# Altium PCB STPMotorControl_1.PcbDoc
Units mm, origin at the board's own origin, x right, y up, seen from the top; angles counter-clockwise.
Board outline 150.88 x 99.69 mm, 6 copper layers (Top Layer, Int1 (GND), Int2 (Sign), Int3 (Sign), Int4 (PWR), Bottom Layer), stack 1.551 mm thick; 149 components, 139 nets, 715 pads, 2 vias.
Unrouted connection lines stored in the file: 411.
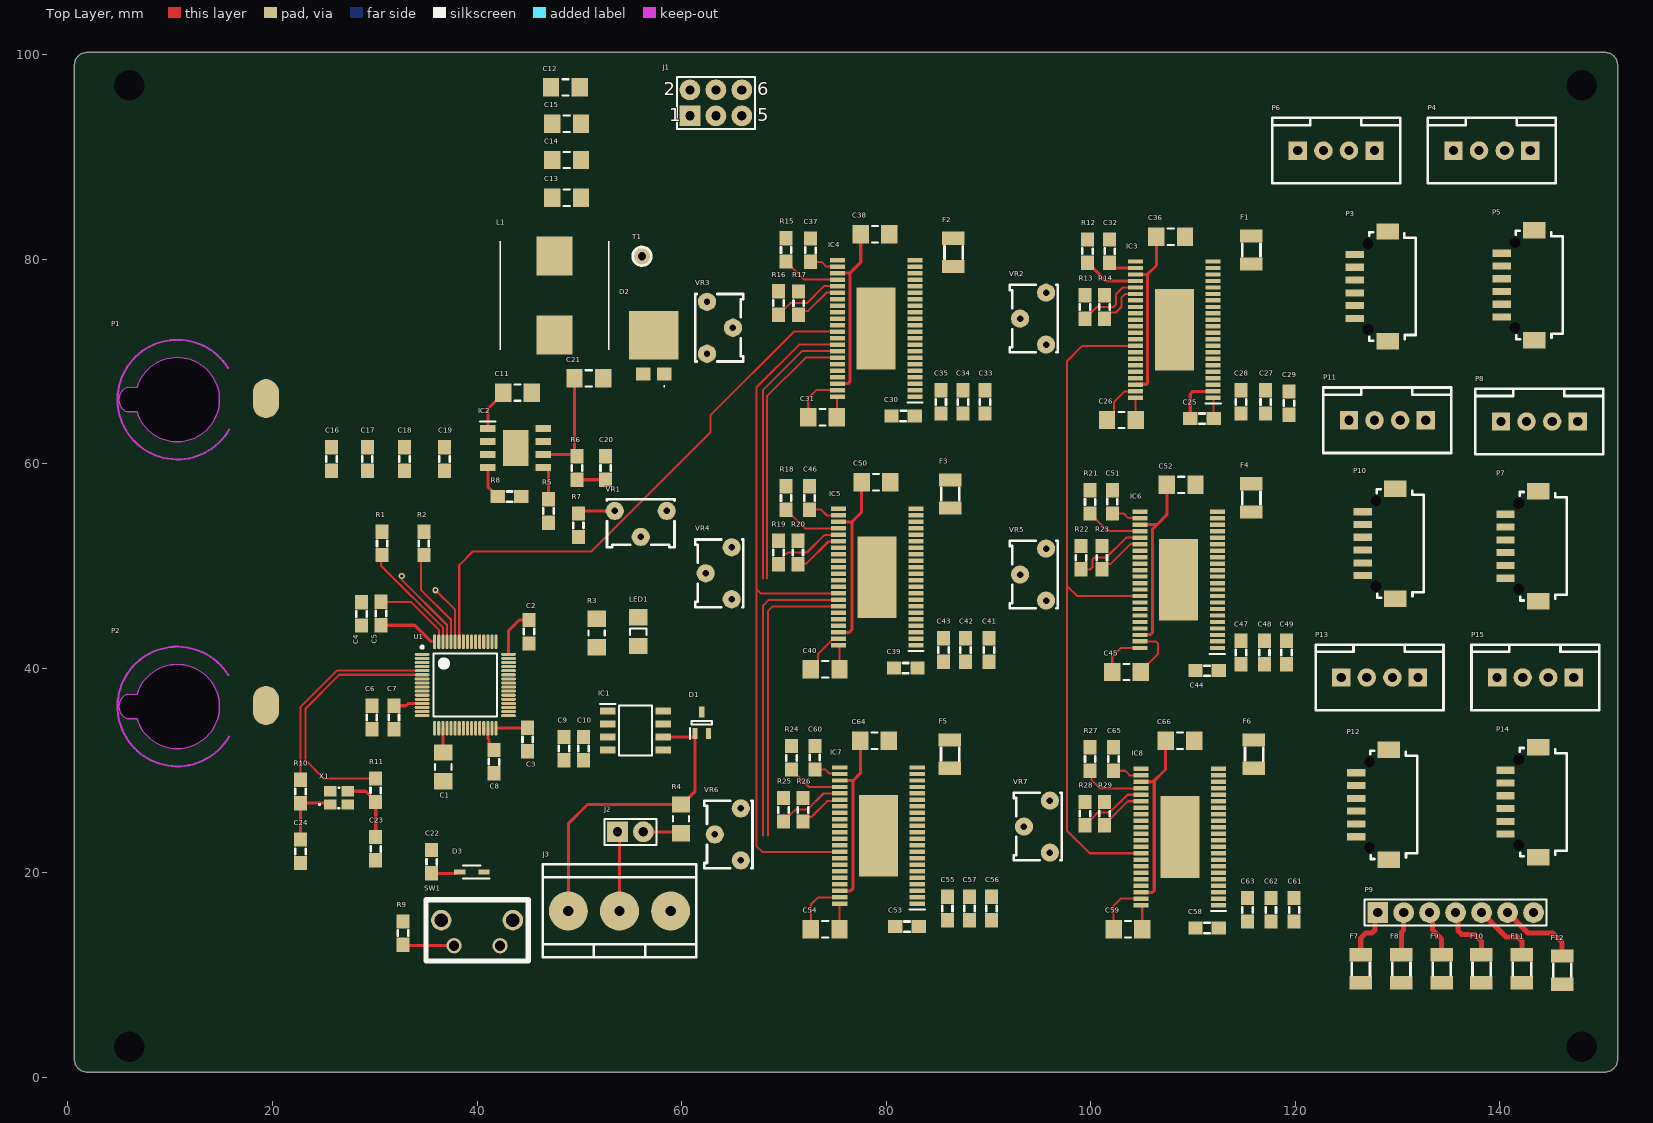
[diagram p0: Top Layer view]
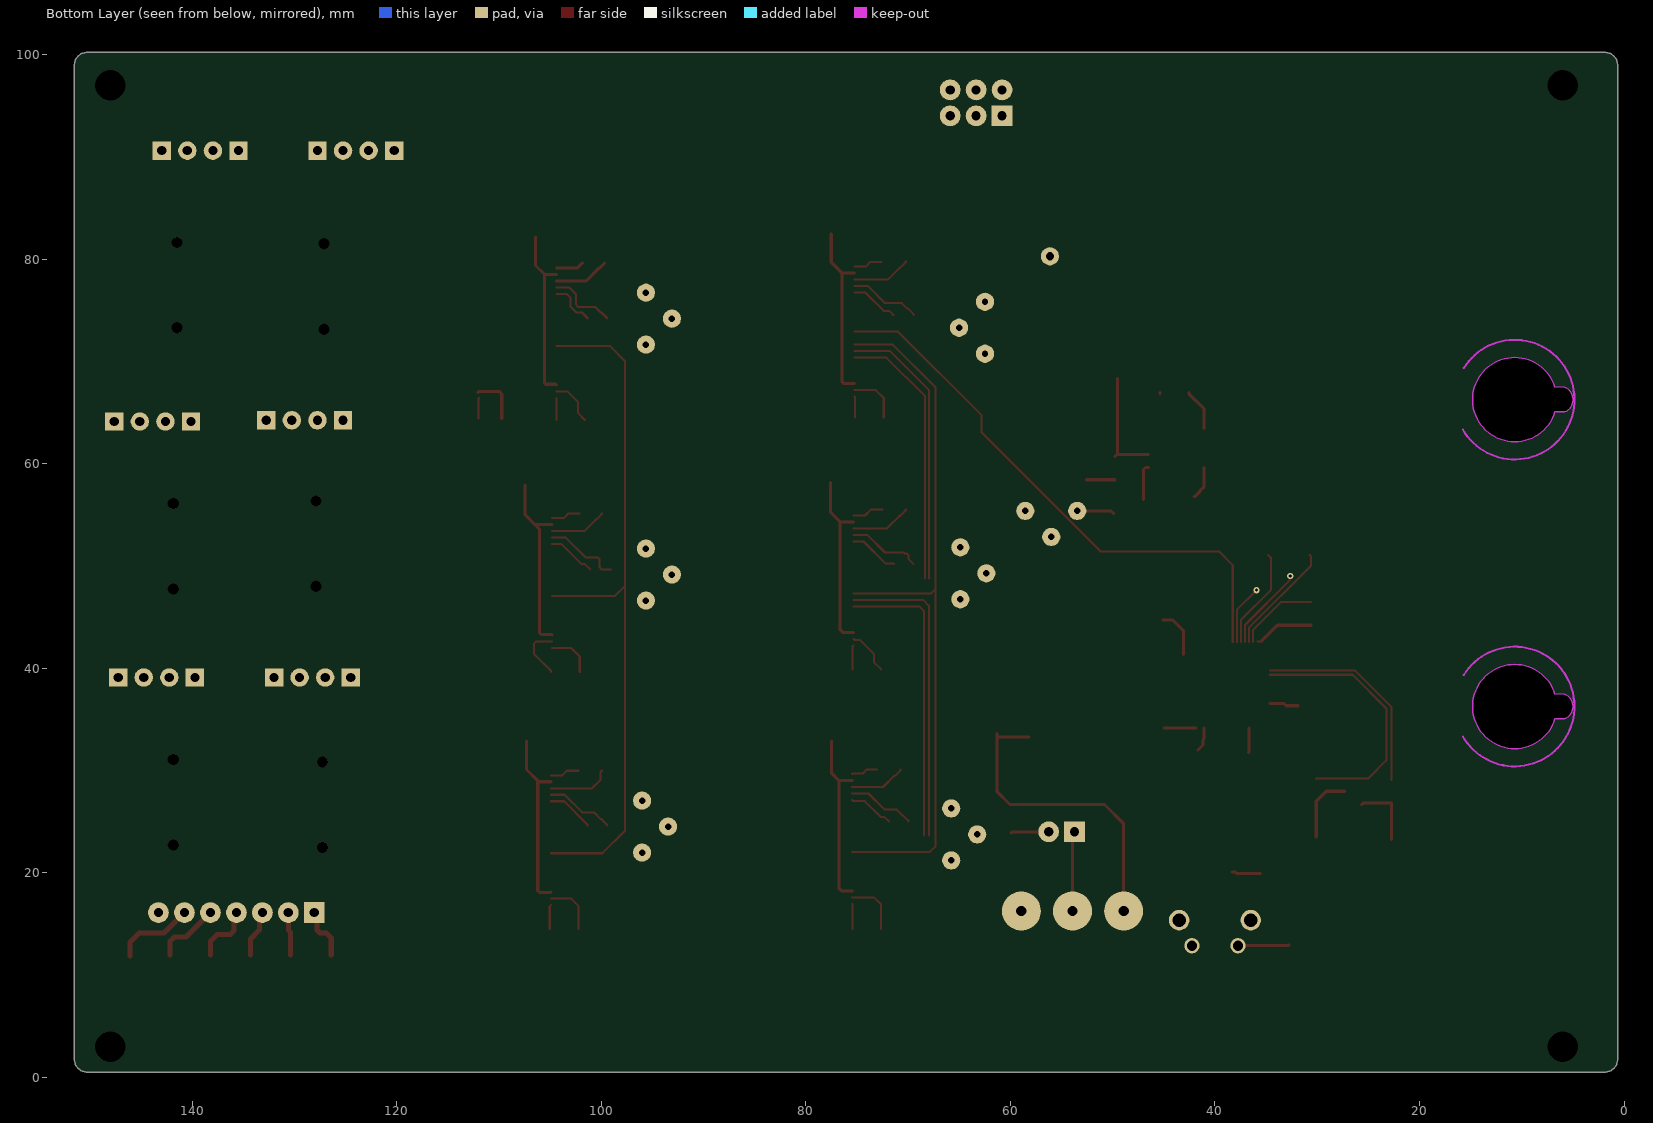
[diagram p1: Bottom Layer view, seen from below]
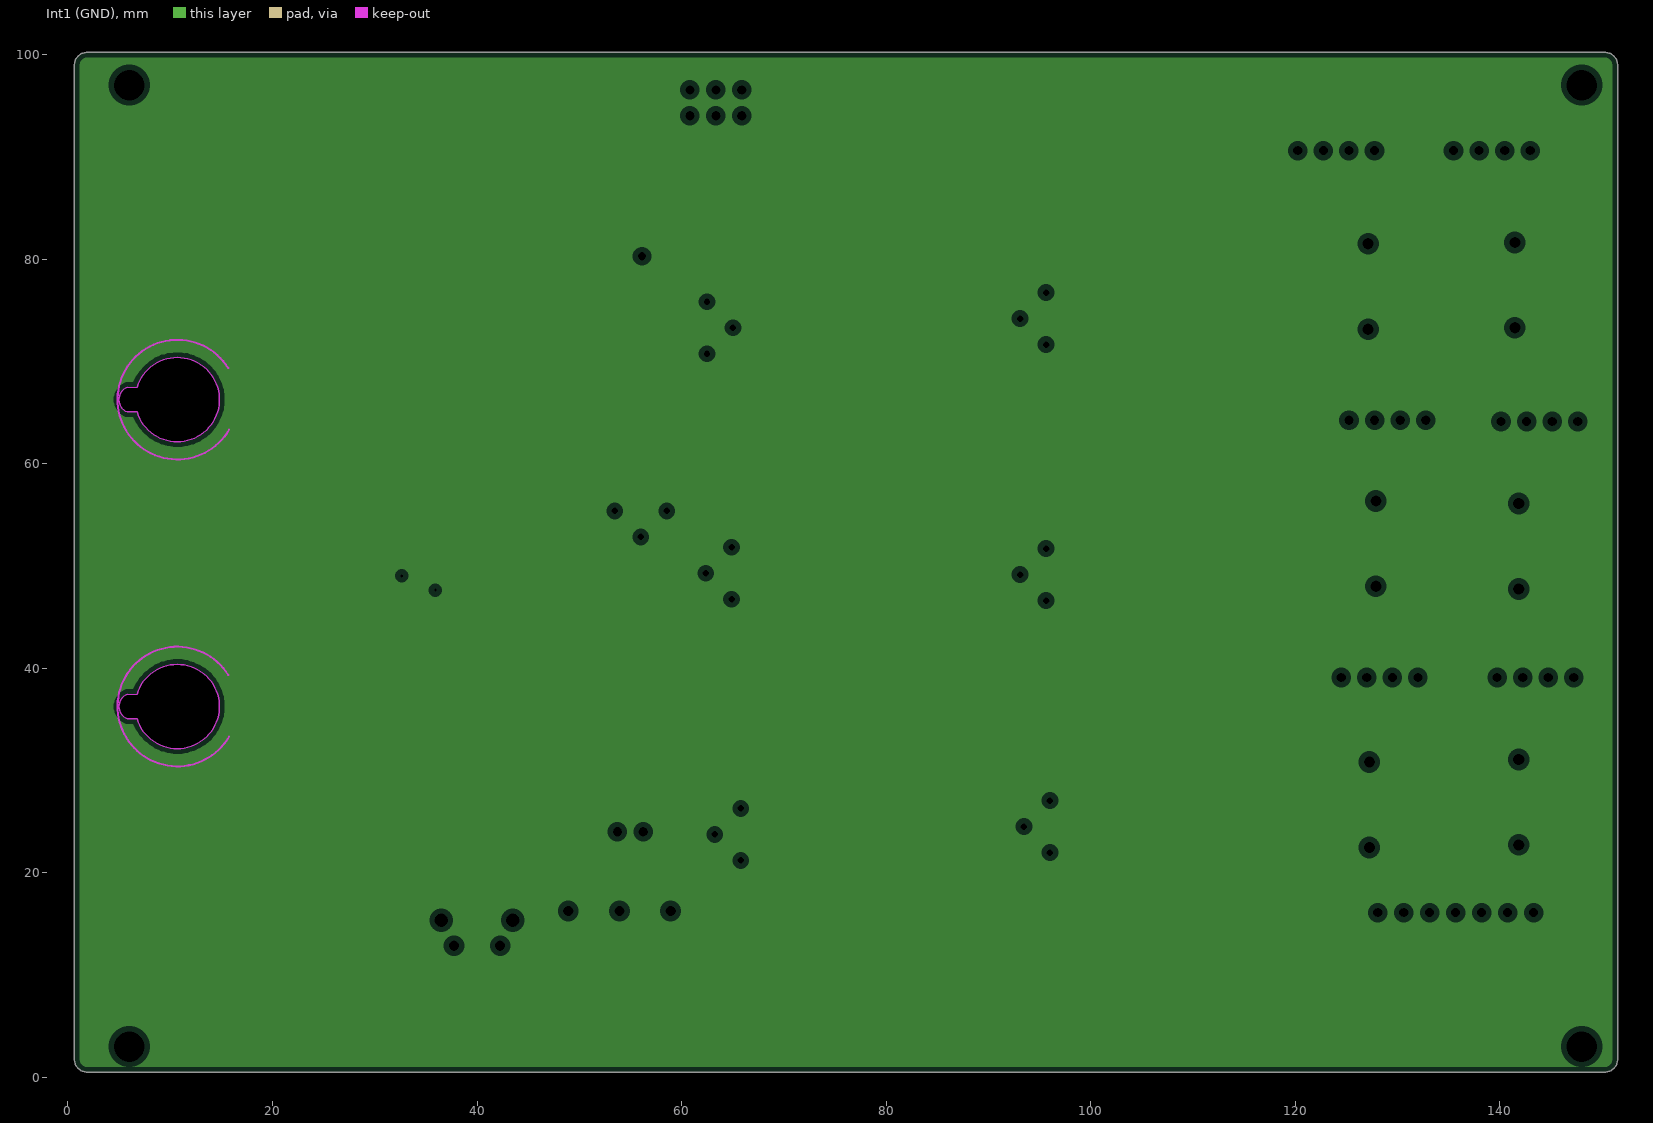
[diagram p2: Int1 (GND), clearances drawn from the general rule]
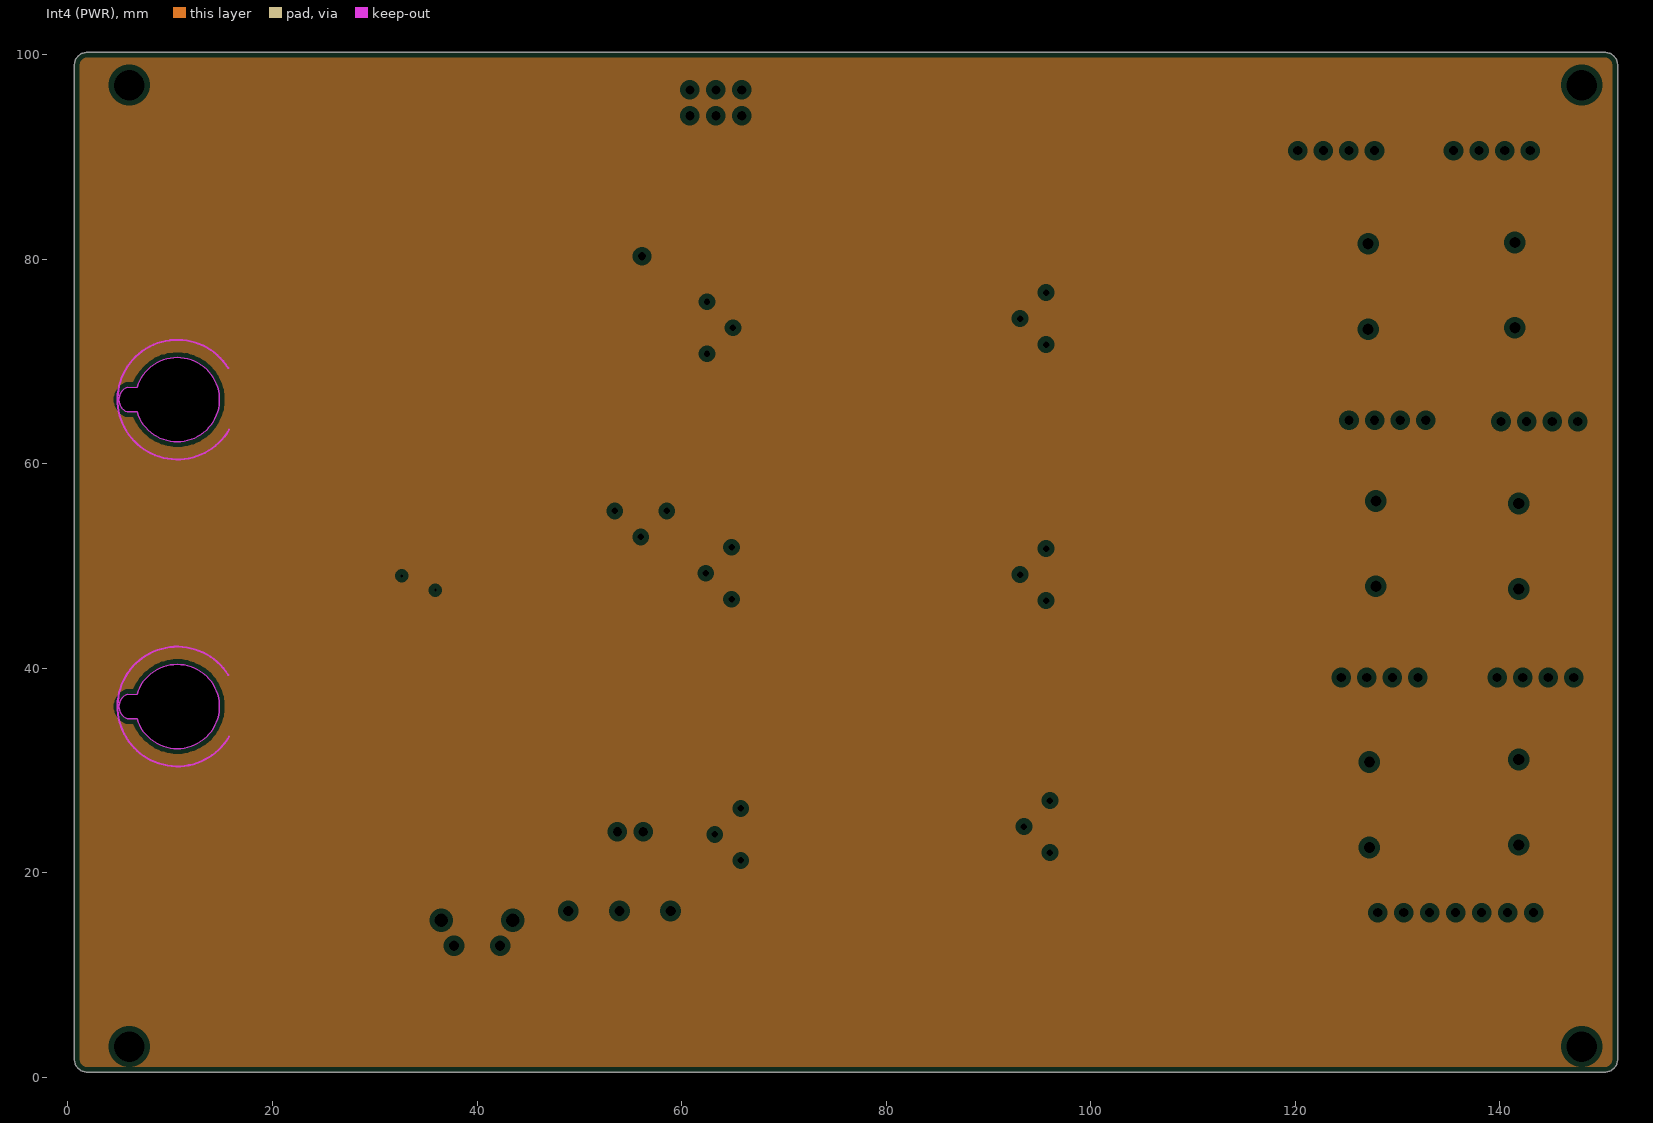
[diagram p3: Int4 (PWR), clearances drawn from the general rule]

## Layer stack, top to bottom
Top Solder: solder mask 0.0254, SM-001, Dk 4
Top Layer: signal copper 0.035
Dielectric 1: prepreg 0.0711, PP-006, Dk 4.1
Dielectric 2: prepreg 0.0711, PP-006, Dk 4.1
Int1 (GND): plane copper 0.035
Dielectric 3: core 0.4572, Core-035, Dk 4.7
Int2 (Sign): signal copper 0.035
Dielectric 4: prepreg 0.0711, PP-006, Dk 4.1
Dielectric 5: prepreg 0.0711, PP-006, Dk 4.1
Int3 (Sign): signal copper 0.035
Dielectric 6: core 0.4572, Core-035, Dk 4.7
Int4 (PWR): plane copper 0.035
Dielectric 7: prepreg 0.0711, PP-006, Dk 4.1
Dielectric 8: prepreg 0.0711, PP-006, Dk 4.1
Bottom Layer: signal copper 0.035
Bottom Solder: solder mask 0.0254, SM-001, Dk 4

## Board outline
0.635,1.778 0.635,98.933 cw(c1.905,98.933) 1.905,100.203 150.241,100.203 cw(c150.241,98.933) 151.511,98.933 151.511,1.778 cw(c150.241,1.778) 150.241,0.508 1.905,0.508 cw(c1.905,1.778)

## Design rules (kind name [scope] priority, off if disabled: settings)
Clearance [All] p1: gap=0.2 ignorepadtopadclearanceinfootprint=TRUE except(0.05: Arc-SMDPad Track-SMDPad)
PlaneClearance [All] p1: clearance=0.508
PlaneConnect [All] p1: planeconnectstyle=Direct reliefexpansion=0.508 reliefentries=4 reliefconductorwidth=0.254 reliefairgap=0.254
PolygonConnect [All] p1: connectstyle=Relief reliefconductorwidth=0.254 reliefentries=4 polygonreliefangle="90 Angle" airgapwidth=0.254
RoutingVias [All] p1: holewidth=0.305 width=0.61 viastyle="Through Hole" minholewidth=0.305 minwidth=0.61 maxholewidth=0.305 maxwidth=0.61
SolderMaskExpansion [All] p1: expansion=0.102 istentingtop=FALSE
SupplyNets "Schematic Supply Nets_2" [InNet('+3V3')] p1: voltage=0.000
SupplyNets "Schematic Supply Nets_1" [InNet('GND')] p2: voltage=0.000
SupplyNets "Schematic Supply Nets" [InNet('+48V')] p3: voltage=0.000
UnRoutedNet [All] p1: checkbadconnections=TRUE
Width [All] p1: maxlimit=1 minlimit=0.2 preferedwidth=0.3 midlayer1_minwidth=0.254 midlayer1_maxwidth=0.254 midlayer1_prefwidth=0.254 midlayer2_minwidth=0.254 midlayer2_maxwidth=0.254 midlayer2_prefwidth=0.254 minimp=50.000000 maximp=50.000000 favimp=50.000000
27 further rules are at their usual default settings.

## Classes and differential pairs
component class Designator: C53 C54 C55 C56 C57 C58 C59 C60 C61 C62 C63 C64 C65 C66 F5 F6 IC7 IC8 R24 R25 R26 R27 R28 R29 VR6 VR7

## Components (designator, comment, footprint, x,y, rotation, side; value= is the part's Value field where it differs from the comment)
C1 "4.7uF" CAP_1206 36.703,28.95 r90 top
C2 "100nF" CAP_0805 45.085,42.418 r90 top
C3 "100nF" CAP_0805 44.958,31.877 r90 top
C4 "100nF" CAP_0805 28.695,46.448 r270 top
C5 "100nF" CAP_0805 30.607,46.482 r270 top
C6 "1uF" CAP_0805 29.718,34.036 r90 top
C7 "100nF" CAP_0805 31.877,34.036 r90 top
C8 "2.2uF" CAP_0805 41.656,32.004 r270 top
C9 "1uF" CAP_0805 48.514,30.988 r90 top
C10 "100nF" CAP_0805 50.419,30.988 r90 top
C11 "0.1uF" CAP_1206 42.558,66.94 r0 top
C12 "10uF" CAP_1206 50.038,96.774 r180 top
C13 "47uF" CAP_1206 50.165,85.979 r180 top
C14 "47uF" CAP_1206 50.165,89.679 r180 top
C15 "47uF" CAP_1206 50.165,93.237 r180 top
C16 "2.2uF" CAP_0805 25.781,59.309 r90 top
C17 "2.2uF" CAP_0805 29.276,59.309 r90 top
C18 "2.2uF" CAP_0805 32.907,59.309 r90 top
C19 "2.2uF" CAP_0805 36.828,59.309 r90 top
C20 "10nF" CAP_0805 52.578,58.42 r90 top
C21 "220pF" CAP_1206 49.53,68.326 r0 top
C22 "100nF" CAP_0805 35.56,22.225 r270 top
C23 "7pF" CAP_0805 30.099,23.495 r270 top
C24 "7pF" CAP_0805 22.733,23.241 r270 top
C25 "1uF" CAP_0805 109.728,64.389 r0 top
C26 "0.1uF" CAP_1206 104.394,64.262 r180 top
C27 "1uF" CAP_0805 117.094,67.183 r270 top
C28 "10nF" CAP_0805 114.681,67.183 r270 top
C29 "10nF" CAP_0805 119.38,67.056 r270 top
C30 "1uF" CAP_0805 80.518,64.643 r0 top
C31 "0.1uF" CAP_1206 75.184,64.516 r180 top
C32 "1uF" CAP_0805 101.854,81.915 r270 top
C33 "1uF" CAP_0805 89.662,67.183 r270 top
C34 "10nF" CAP_0805 87.503,67.183 r270 top
C35 "10nF" CAP_0805 85.344,67.183 r270 top
C36 "0.1uF" CAP_1206 109.22,82.169 r180 top
C37 "1uF" CAP_0805 72.597,82.007 r270 top
C38 "0.1uF" CAP_1206 80.318,82.423 r180 top
C39 "1uF" CAP_0805 83.058,40.005 r180 top
C40 "0.1uF" CAP_1206 72.644,39.878 r0 top
C41 "1uF" CAP_0805 90.043,42.926 r270 top
C42 "10nF" CAP_0805 87.757,42.926 r270 top
C43 "10nF" CAP_0805 85.598,42.926 r270 top
C44 "1uF" CAP_0805 112.522,39.751 r180 top
C45 "0.1uF" CAP_1206 104.902,39.624 r180 top
C46 "1uF" CAP_0805 72.517,55.499 r90 top
C47 "1uF" CAP_0805 114.681,42.672 r270 top
C48 "10nF" CAP_0805 116.967,42.672 r270 top
C49 "10nF" CAP_0805 119.126,42.672 r270 top
C50 "0.1uF" CAP_1206 77.597,58.166 r0 top
C51 "1uF" CAP_0805 102.108,55.118 r90 top
C52 "0.1uF" CAP_1206 107.442,57.912 r0 top
C53 "1uF" CAP_0805 83.185,14.732 r180 top
C54 "0.1uF" CAP_1206 72.644,14.478 r0 top
C55 "1uF" CAP_0805 85.979,17.653 r270 top
C56 "10nF" CAP_0805 90.297,17.653 r270 top
C57 "10nF" CAP_0805 88.138,17.653 r270 top
C58 "1uF" CAP_0805 112.522,14.605 r180 top
C59 "0.1uF" CAP_1206 102.235,14.478 r0 top
C60 "1uF" CAP_0805 73.025,30.099 r90 top
C61 "1uF" CAP_0805 119.888,17.526 r270 top
C62 "10nF" CAP_0805 117.602,17.526 r270 top
C63 "10nF" CAP_0805 115.316,17.526 r270 top
C64 "0.1uF" CAP_1206 77.47,32.893 r0 top
C65 "1uF" CAP_0805 102.235,29.972 r90 top
C66 "0.1uF" CAP_1206 107.315,32.893 r0 top
D1 "ESDCAN03-2BWY" SOT65P210X110-3N 61.976,34.671 r90 top
D2 "SS5P6-M3_87A" SS5P6M387A 57.277,71.501 r0 top
D3 "TSD05CDYFR" SOD2613X100N 39.497,20.066 r180 top
F1 "1206L035/16YR" MC36207 115.697,79.502 r90 top
F2 "1206L035/16YR" MC36207 86.58,79.274 r90 top
F3 "1206L035/16YR" MC36207 86.259,55.651 r90 top
F4 "1206L035/16YR" MC36207 115.697,55.27 r90 top
F5 "1206L035/16YR" MC36207 86.233,30.226 r90 top
F6 "1206L035/16YR" MC36207 115.951,30.226 r90 top
F7 "1206L035/16YR" MC36207 126.399,9.237 r90 top
F8 "1206L035/16YR" MC36207 130.363,9.237 r90 top
F9 "1206L035/16YR" MC36207 134.3,9.237 r90 top
F10 "1206L035/16YR" MC36207 138.198,9.237 r90 top
F11 "1206L035/16YR" MC36207 142.147,9.237 r90 top
F12 "1206L035/16YR" MC36207 146.084,9.11 r90 top
IC1 "TCAN3403DRQ1" SOIC127P600X175-8N 55.499,33.909 r0 top
IC2 "RT6365GSP" SOIC127P600X175-9N 43.776,61.522 r0 top
IC3 "DRV8462DDWR" SOP64P810X120-45N 108.182,73.088 r180 top
IC4 "DRV8462DDWR" SOP64P810X120-45N 79.016,73.216 r180 top
IC5 "DRV8462DDWR" SOP64P810X120-45N 79.121,48.895 r180 top
IC6 "DRV8462DDWR" SOP64P810X120-45N 108.585,48.641 r180 top
IC7 "DRV8462DDWR" SOP64P810X120-45N 79.248,23.622 r180 top
IC8 "DRV8462DDWR" SOP64P810X120-45N 108.712,23.495 r180 top
J1 "HDR3X2" HDR2X3_AUT 60.811,93.995 r0 top
J2 "HDR1X2V" HDR1X2_AUT 53.721,24.003 r0 top
J3 "SCREWX3" SCREW3_AUT 58.928,16.256 r180 top
L1 "7.8uH" WE-HCI_103023 47.58,76.437 r90 top
LED1 "LED-RED" LED1206R 55.753,42.164 r90 top
P1 "BS" Banana_AUT 10.71,66.251 r180 top
P2 "BS" Banana_AUT 10.71,36.251 r180 top
P3 "DF13-6P" DF13-6 127.415,77.318 r270 top
P4 "JST 4" XA-4 142.964,90.593 r180 top
P5 "DF13-6P" DF13-6 141.766,77.445 r270 top
P6 "JST 4" XA-4 127.741,90.593 r180 top
P7 "DF13-6P" DF13-6 142.147,51.918 r270 top
P8 "JST 4" XA-4 147.608,64.11 r180 top
P9 "HDR1X7V" HDR1X7_AUT 128.05,16.104 r0 top
P10 "DF13-6P" DF13-6 128.177,52.172 r270 top
P11 "JST 4" XA-4 132.749,64.237 r180 top
P12 "DF13-6P" DF13-6 127.542,26.645 r270 top
P13 "JST 4" XA-4 131.987,39.091 r180 top
P14 "DF13-6P" DF13-6 142.147,26.899 r270 top
P15 "JST 4" XA-4 147.227,39.091 r180 top
R1 "5k1" RES_0805 30.734,53.34 r270 top
R2 "10k" RES_0805 34.798,53.34 r270 top
R3 "1k" RES_1206 51.689,44.831 r270 top
R4 "120R" RES_1206 59.944,26.67 r270 top
R5 "31k6" RES_0805 46.99,56.515 r270 top
R6 "5k36" RES_0805 49.784,60.706 r270 top
R7 "9k1" RES_0805 49.911,55.118 r270 top
R8 "332k" RES_0805 42.037,56.769 r0 top
R9 "10k" RES_0805 32.766,12.954 r90 top
R10 "0R" RES_0805 22.733,26.797 r90 top
R11 "0R" RES_0805 30.099,29.21 r270 top
R12 "10k" RES_0805 99.695,81.915 r270 top
R13 "10k" RES_0805 99.441,76.454 r270 top
R14 "10k" RES_0805 101.346,76.454 r270 top
R15 "10k" RES_0805 70.231,82.042 r270 top
R16 "10k" RES_0805 69.469,76.835 r270 top
R17 "10k" RES_0805 71.452,76.83 r270 top
R18 "10k" RES_0805 70.231,57.785 r270 top
R19 "10k" RES_0805 69.469,52.451 r270 top
R20 "10k" RES_0805 71.374,52.451 r270 top
R21 "10k" RES_0805 99.949,57.404 r270 top
R22 "10k" RES_0805 99.06,51.943 r270 top
R23 "10k" RES_0805 101.092,51.943 r270 top
R24 "10k" RES_0805 70.739,32.385 r270 top
R25 "10k" RES_0805 69.977,27.305 r270 top
R26 "10k" RES_0805 71.882,27.305 r270 top
R27 "10k" RES_0805 99.949,32.258 r270 top
R28 "10k" RES_0805 99.441,26.924 r270 top
R29 "10k" RES_0805 101.346,26.924 r270 top
SW1 "EVQPF" EVQPF203M 40.005,15.367 r0 top
T1 "Terminal1" PAD1_AUT 56.134,80.264 r0 top
U1 "STM32C552RET6" LQFP40P900X900X145-64N 38.862,38.354 r0 top
VR1 "2k" 3362S 56.007,54.102 r180 top
VR2 "30k" 3362S 94.361,74.168 r90 top
VR3 "30k" 3362S 63.754,73.279 r270 top
VR4 "30k" 3362S 63.627,49.276 r90 top
VR5 "30k" 3362S 94.361,49.149 r90 top
VR6 "30k" 3362S 64.516,23.749 r90 top
VR7 "30k" 3362S 94.742,24.511 r90 top
X1 "24MHz" CX2520SB 25.654,26.67 r0 top

## Footprints (in the part's own frame and the unit in brackets; to place one, negate y for a bottom-side part, rotate by r counter-clockwise, add the part's x,y. Pads: shape width x height; smd on the part's side, far side on the other; paste and mask are expansions set on the pad)
3362S [mil] "3362 - 1/4 ” Square Trimpot, Trimming Potentiometer"
  round 70 hole 25: 1(100,-50) 2(-100,-50) W(0,50)
  silkscreen extent -130,-95 130,90, body extent -130,-95 130,91, height 278
Banana_AUT [mm] "Power (11mm Diameter, 15.5mm Length)"
  oval 2.54x3.81 smd: 1(-8.65,-0.1)
  Keep-Out Layer board cut-out: 3.945,-1.205 2.834,-2.995 0.983,-4.002 -1.124,-3.962 -2.935,-2.885 -3.978,-1.054 -3.978,1.054 -2.935,2.885 -1.124,3.962 0.983,4.002 2.834,2.995 3.945,1.205 3.945,1.205 4.902,1.205 4.902,1.205 5.399,0.849 5.679,0.306 5.679,-0.306 5.399,-0.849 4.902,-1.205 4.902,-1.205 4.902,-1.205
  Keep-Out Layer lines w0.025: 4.902,1.205 cw(c4.416,0) 4.902,-1.205 3.945,-1.205 cw(c0.005,0) 3.945,1.205 4.902,1.205
  Keep-Out Layer lines w0.2: -4.969,-3.079 ccw(c0.005,0) -5.062,2.923
  body extent -5.17,-4.7 5.62,4.8, height 4.57
CAP_0805 [mil] "Body 2.0 x 1.3mm (LxW typ)"
  rect 55x50 smd: 1(0,0) 2(90,0)
  silkscreen extent 35,-20 56,20, body extent 6,-24 85,24, height 47
CAP_1206 [mm] "Body 3.2 x 1.6 mm (LxW typ)"
  rect 1.6x1.8 smd: 1(0,0) 2(2.8,0)
  silkscreen extent 1.1,-0.8 1.7,0.8, body extent -0.15,-0.81 3.05,0.79, height 1.6
CX2520SB [mm] "Crystal Units, Body 2.5×2.0 mm (LxW)"
  rect 1.2x1 smd: 1(0,0) 2(1.7,0) 3(1.7,1.3) 4(0,1.3)
  silkscreen extent -1.1,-0.35 0.87,1.65, body extent -0.45,-0.35 2.05,1.65, height 0.79
DF13-6 [mm] "HIROSE Right Angle, DF13 Series, Surface Mount, Header, 6 Contacts, 1.25 mm"
  rect 1.6x2.2 smd: 0(-5.375,1.6) 0(5.375,1.6)
  round 1 hole 1.1: 0(-4.175,-0.3) 0(4.175,-0.3)
  rect 0.7x1.8 smd: 1(-3.125,-1.6) 2(-1.875,-1.6) 3(-0.625,-1.6) 4(0.625,-1.6) 5(1.875,-1.6) 6(3.125,-1.6)
  silkscreen extent -5.3,-0.2 5.3,4.37, body extent -6.12,-2.15 6.03,4.35, height 3.58
EVQPF203M [mm] "PANASONIC  EVQPF203M  SWITCH, TACTILE, SPST-NO, 20mA, 15VDC"
  round 2 hole 1.3: 0(-3.5,0) 0(3.5,0)
  round 1.5 hole 1: 1(-2.25,-2.5) 2(2.25,-2.5)
  silkscreen extent -5,-4 5,2, body extent -3.67,-10.87 3.73,1.63, height 7
HDR1X2_AUT [mil] "Connector; Header; 2 Position; Pitch 2.54mm, Straight"
  rect 80x80 hole 35.43: 1(0,0)
  round 80 hole 35.43: 2(100,0)
  silkscreen extent -50,-50 150,50, body extent -48,-48 152,52, height 399
HDR1X7_AUT [mil] "Connector; Header; 7 Position; Pitch 2.54mm, Straight"
  rect 80x80 hole 35.43: 1(0,0)
  round 80 hole 35.43: 2(100,0) 3(200,0) 4(300,0) 5(400,0) 6(500,0) 7(600,0)
  silkscreen extent -50,-50 650,50, body extent -50,-50 650,50, height 398
HDR2X3_AUT [mil] "Connector; Header; 3x2 Position"
  rect 80x80 hole 35.43: 1(0,0)
  round 80 hole 35.43: 2(0,100) 3(100,0) 4(100,100) 5(200,0) 6(200,100)
  silkscreen extent -50,-50 250,150, body extent -50,-50 250,150, height 398
LED1206R [mm] "SMD; Red LED; Body 3.2 x 1.6 mm"
  rect 1.6x1.8 smd: A(0,0) K(2.8,0)
  silkscreen extent 1.1,-0.8 1.7,0.8, body extent -0.2,-0.84 3,0.76, height 1.09
LQFP40P900X900X145-64N [mm] "LQFP, 64-Leads, Body 7.00x7.00mm, Pitch 0.40mm, IPC Medium Density"
  oval 1.45x0.3 smd: 1(-4.225,3) 2(-4.225,2.6) 3(-4.225,2.2) 4(-4.225,1.8) 5(-4.225,1.4) 6(-4.225,1) 7(-4.225,0.6) 8(-4.225,0.2) 9(-4.225,-0.2) 10(-4.225,-0.6) 11(-4.225,-1) 12(-4.225,-1.4) 13(-4.225,-1.8) 14(-4.225,-2.2) 15(-4.225,-2.6) 16(-4.225,-3) 33(4.225,-3) 34(4.225,-2.6) 35(4.225,-2.2) 36(4.225,-1.8) 37(4.225,-1.4) 38(4.225,-1) 39(4.225,-0.6) 40(4.225,-0.2) 41(4.225,0.2) 42(4.225,0.6) 43(4.225,1) 44(4.225,1.4) 45(4.225,1.8) 46(4.225,2.2) 47(4.225,2.6) 48(4.225,3)
  oval 0.3x1.45 smd: 17(-3,-4.225) 18(-2.6,-4.225) 19(-2.2,-4.225) 20(-1.8,-4.225) 21(-1.4,-4.225) 22(-1,-4.225) 23(-0.6,-4.225) 24(-0.2,-4.225) 25(0.2,-4.225) 26(0.6,-4.225) 27(1,-4.225) 28(1.4,-4.225) 29(1.8,-4.225) 30(2.2,-4.225) 31(2.6,-4.225) 32(3,-4.225) 49(3,4.225) 50(2.6,4.225) 51(2.2,4.225) 52(1.8,4.225) 53(1.4,4.225) 54(1,4.225) 55(0.6,4.225) 56(0.2,4.225) 57(-0.2,4.225) 58(-0.6,4.225) 59(-1,4.225) 60(-1.4,4.225) 61(-1.8,4.225) 62(-2.2,4.225) 63(-2.6,4.225) 64(-3,4.225)
  silkscreen extent -4.35,-3.1 3.1,3.82, body extent -4.5,-4.5 4.5,4.5, height 1.45
MC36207 [mm] "FUSE, PTC RESET. 3.5x1.8x0.75mm (LxWxH)"
  rect 1.3x2.2 smd: 1(0,0) 2(2.75,0)
  silkscreen extent 0.75,-0.9 1.98,0.87, body extent -0.35,-0.88 3.15,0.92, height 0.75
PAD1_AUT [mil] "Teminal Pad; 70 x 70 mil; Hole, 32mil"
  round 70 hole 32: 1(0,0)
  silkscreen extent -36,-36 36,36, body extent -40,-37 34,37, height 319
RES_0805 [mil] "Body 2.0 x 1.3mm (LxW typ)"
  rect 55x50 smd: 1(0,0) 2(90,0)
  silkscreen extent 35,-20 56,20, body extent 3,-25 82,24, height 20
RES_1206 [mm] "Body 3.2 x 1.6 mm (LxW typ)"
  rect 1.6x1.8 smd: 1(0,0) 2(2.8,0)
  silkscreen extent 1.14,-0.8 1.65,0.8, body extent -0.21,-0.8 2.96,0.75, height 0.6
SCREW3_AUT [mil] "PCB Terminal Interlocking Block; CMM; 3 Poles; Pitch, 5 mm"
  round 150 hole 40: 1(0,0) 2(196.85,0) 3(393.7,0)
  silkscreen extent -98,-180 492,178, body extent -100,-155 490,164, height 394
SOD2613X100N [mm]
  rect 1.1x0.5 smd: 1(-1.175,0) 2(1.175,0)
  silkscreen extent -1.73,-0.65 0.85,0.65, body extent -1.33,-0.65 1.33,0.65, height 1
SOIC127P600X175-8N [mm]
  rect 1.528x0.65 smd: 1(-2.711,1.905) 2(-2.711,0.635) 3(-2.711,-0.635) 4(-2.711,-1.905) 5(2.711,-1.905) 6(2.711,-0.635) 7(2.711,0.635) 8(2.711,1.905)
  silkscreen extent -3.47,-2.45 1.6,2.58, body extent -3,-2.45 3,2.45, height 1.75
SOIC127P600X175-9N [mm]
  rect 1.522x0.7 smd: 1(-2.714,1.905) 2(-2.714,0.635) 3(-2.714,-0.635) 4(-2.714,-1.905) 5(2.714,-1.905) 6(2.714,-0.635) 7(2.714,0.635) 8(2.714,1.905)
  rect 2.5x3.5 smd: 9(0,0)
  silkscreen extent -3.48,2.6 -1.95,2.6, body extent -3,-2.45 3,2.45, height 1.46
SOP64P810X120-45N [mm]
  rect 1.475x0.435 smd: 1(-3.788,6.668) 2(-3.788,6.032) 3(-3.788,5.398) 4(-3.788,4.762) 5(-3.788,4.128) 6(-3.788,3.492) 7(-3.788,2.858) 8(-3.788,2.222) 9(-3.788,1.588) 10(-3.788,0.952) 11(-3.788,0.318) 12(-3.788,-0.318) 13(-3.788,-0.952) 14(-3.788,-1.588) 15(-3.788,-2.222) 16(-3.788,-2.858) 17(-3.788,-3.492) 18(-3.788,-4.128) 19(-3.788,-4.762) 20(-3.788,-5.398) 21(-3.788,-6.032) 22(-3.788,-6.668) 23(3.788,-6.668) 24(3.788,-6.032) 25(3.788,-5.398) 26(3.788,-4.762) 27(3.788,-4.128) 28(3.788,-3.492) 29(3.788,-2.858) 30(3.788,-2.222) 31(3.788,-1.588) 32(3.788,-0.952) 33(3.788,-0.318) 34(3.788,0.318) 35(3.788,0.952) 36(3.788,1.588) 37(3.788,2.222) 38(3.788,2.858) 39(3.788,3.492) 40(3.788,4.128) 41(3.788,4.762) 42(3.788,5.398) 43(3.788,6.032) 44(3.788,6.668)
  rect 3.8x8 smd: 45(0,0)
  silkscreen extent -4.53,7.23 -3.05,7.23, body extent -4.05,-7 4.05,7, height 1.2
SOT65P210X110-3N [mm]
  rect 1.05x0.5 smd: 1(-1.05,0.65) 2(-1.05,-0.65) 3(1.05,0)
  silkscreen extent -1.58,-1 0.18,1.15, body extent -1.05,-1 1.05,1, height 1.1
SS5P6M387A [mm]
  rect 1.4x1.27 smd: 1(1.04,-2.765) 2(-1.04,-2.765)
  rect 4.8x4.72 smd: 3(0,1.04)
  silkscreen extent 0.99,-4 1.09,-3.9, body extent -2.15,-3.27 2.15,3.05, height 1.3
WE-HCI_103023 [mm]
  rect 3.8x3.5 smd: 1(-3.85,0) 2(3.85,0)
  silkscreen extent -5.3,-5.3 5.3,5.3, body extent -5.25,-4.9 5.25,5.16, height 4.96
XA-4 [mm] "XA Connector (JST), 4 Pins, Pitch 2.5mm"
  rect 1.8x1.8 hole 0.9: 1(7.5,0) 4(0,0)
  round 1.8 hole 0.9: 2(5,0) 3(2.5,0)
  silkscreen extent -2.5,-3.2 10,3.2, body extent -2.55,-3.23 9.95,3.17, height 8.8

## Part data
C1 C11 C12 C13 C14 C15 C21 C26 C31 C36 C38 C40 C45 C50 C52 C54 C59 C64 C66: library part "CAPN 1206", "Non Polarized Capacitor, SMD, 1206"
C2 C3 C4 C5 C6 C7 C8 C9 C10 C16 C17 C18 C19 C20 C22 C23 C24 C25 C27 C28 C29 C30 C32 C33 C34 C35 C37 C39 C41 C42 C43 C44 C46 C47 C48 C49 C51 C53 C55 C56 C57 C58 C60 C61 C62 C63 C65: library part "CAPN 0805", "Non Polarized Capacitor, SMD, 0805"
D1: "TVS Diode (Uni-directional)", Manufacturer_Name=STMicroelectronics, Mouser Part Number=511-ESDCAN03-2BWY, Arrow Part Number=ESDCAN03-2BWY, Arrow Price/Stock=https://www.arrow.com/en/products/esdcan03-2bwy/stmicroelectronics.html?utm_currency=USD&region=europe, Datasheet Link=https://www.st.com/resource/en/datasheet/esdcan03-2bwy.pdf, Height=1.1mm, Manufacturer_Part_Number=ESDCAN03-2BWY, Mouser Price/Stock=https://www.mouser.co.uk/ProductDetail/STMicroelectronics/ESDCAN03-2BWY?qs=FqY30PPN9V2iiokjuqa22Q%3D%3D
D2: "Schottky Diode", Arrow Part Number=SS5P6-M3/87A, Manufacturer_Name=Vishay, Mouser Part Number=625-SS5P6-M3/87A, Arrow Price/Stock=https://www.arrow.com/en/products/ss5p6-m387a/vishay?utm_currency=USD&region=nac, Datasheet Link=https://www.vishay.com/docs/88988/ss5p6.pdf, Height=1.2mm, Manufacturer_Part_Number=SS5P6-M3/87A, Mouser Price/Stock=https://www.mouser.co.uk/ProductDetail/Vishay-General-Semiconductor/SS5P6-M3-87A?qs=XGzIaZb%2FFYLx0h%2FWoI%2FVUQ%3D%3D
D3: "TVS Diode (Bi-directional)", Manufacturer_Name="Texas Instruments", Mouser Part Number=595-TSD05CDYFR, Arrow Part Number=TSD05CDYFR, Arrow Price/Stock=https://www.arrow.com/en/products/tsd05cdyfr/texas-instruments.html?utm_currency=USD&region=nac, Datasheet Link=https://www.ti.com/lit/ds/symlink/tsd05c.pdf?ts=1691730725852&ref_url=https%253A%252F%252Fwww.ti.com%252Fproduct%252FTSD05C%253FkeyMatch%253DTSD05CDYFR%2526tisearch%253Dsearch-everything%2526usecase%253DOPN, Height=1mm, Manufacturer_Part_Number=TSD05CDYFR, Mouser Price/Stock=https://www.mouser.co.uk/ProductDetail/Texas-Instruments/TSD05CDYFR?qs=Imq1NPwxi74wAiGFX0POZQ%3D%3D
F1 F2 F3 F4 F5 F6 F7 F8 F9 F10 F11 F12: "Fuse, PTC Reset, 350mA Hold, 750mA Tripping, 16v", Supplier Part Number 1=1822203, Supplier 1=Element14
IC1: "Integrated Circuit", Manufacturer_Name="Texas Instruments", Mouser Part Number=595-TCAN3403DRQ1, Arrow Part Number=TCAN3403DRQ1, Arrow Price/Stock=https://www.arrow.com/en/products/tcan3403drq1/texas-instruments?utm_currency=USD&region=nac, Datasheet Link=https://www.ti.com/lit/ds/symlink/tcan3403-q1.pdf?ts=1732780388772&ref_url=https%253A%252F%252Fwww.ti.com%252Fproduct%252FTCAN3403-Q1%252Fpart-details%252FTCAN3403DRQ1, Height=1.75mm, Manufacturer_Part_Number=TCAN3403DRQ1, Mouser Price/Stock=https://www.mouser.co.uk/ProductDetail/Texas-Instruments/TCAN3403DRQ1?qs=VVKQmw408U8i3BeOClYB9g%3D%3D
IC2: "Integrated Circuit", Manufacturer_Name=RICHTEK, Mouser Part Number=835-RT6365GSP, Datasheet Link=https://www.richtek.com/assets/product_file/RT6365/DS6365-02.pdf, Height=1.753mm, Manufacturer_Part_Number=RT6365GSP, Mouser Price/Stock=https://www.mouser.co.uk/ProductDetail/Richtek/RT6365GSP?qs=amGC7iS6iy%252BGHkAL3RFUug%3D%3D
IC3 IC4 IC5 IC6 IC7 IC8: "Integrated Circuit", Manufacturer_Name="Texas Instruments", Mouser Part Number=595-DRV8462DDWR, Arrow Part Number=DRV8462DDWR, Arrow Price/Stock=https://www.arrow.com/en/products/drv8462ddwr/texas-instruments?utm_currency=USD&region=nac, Datasheet Link=https://www.ti.com/lit/gpn/drv8462, Height=1.2mm, Manufacturer_Part_Number=DRV8462DDWR, Mouser Price/Stock=https://www.mouser.co.uk/ProductDetail/Texas-Instruments/DRV8462DDWR?qs=rQFj71Wb1eVexvYNsDfnvA%3D%3D
J1: "Header, 3-Pin, Dual row, 2.54mm Pitch, Straight", Supplier Part Number 1=9733574, Supplier 1=Farnell
J2: "Header, Plug, 2.54mm, 2 Pins, Straight", Supplier Part Number 1=2254030, Supplier 1=Farnell
J3: "Terminal Block, PCB, 3Way, Pitch 5mm", Supplier Part Number 1=9632689, Supplier 1=Farnell
L1: library part 744325780, "Inductor", Manufacturer_Name="Wurth Elektronik", Mouser Part Number=710-744325780, Datasheet Link=https://www.we-online.com/catalog/datasheet/744325780.pdf, Height=4.7mm, Manufacturer_Part_Number=744325780, Mouser Price/Stock=https://www.mouser.co.uk/ProductDetail/Wurth-Elektronik/744325780?qs=VxkwJfKV0FQ2%2FeCS8beGcw%3D%3D
LED1: library part "SMD 1206 LED-RED", "RED LED, Case 1206", Supplier Part Number 1=8530017, Supplier 1=Farnell
P1 P2: library part "Banana Socket", "Banana Socket, 4mm, Panel, Black, 10A", Supplier Part Number 1=1101113, Supplier 1=Farnell
P3 P5 P7 P10 P12 P14: "HIROSE(HRS)  DF13-6P-1.25H(20)  Wire-To-Board Connector, Right Angle, DF13 Series, Surface Mount, Header, 6 Contacts, 1.25 mm", Supplier Part Number 1=1324928, Supplier 1=Farnell
P4 P6 P8 P11 P13 P15: library part "JST XA Header 4", "JST XA Header, 4-Pin, Pitch 2.5mm", Supplier Part Number 1=9492089, Supplier 1=Farnell
P9: "Header, Plug, 2.54mm, 7 Pins, Straight", Supplier Part Number 1=9731121, Supplier 1=Farnell
R1 R2 R5 R6 R7 R8 R9 R10 R11 R12 R13 R14 R15 R16 R17 R18 R19 R20 R21 R22 R23 R24 R25 R26 R27 R28 R29: library part "Resistor 0805", "Resistor, SMD, 0805"
R3 R4: library part "Resistor 1206", "Resistor, SMD, 1206"
SW1: "PANASONIC  EVQPF203M  SWITCH, TACTILE, SPST-NO, 20mA, 15VDC", Supplier Part Number 1=2079505, Supplier 1=Farnell
T1: "Terminal, Pad 70x70mil, Hole 32 mil"
U1: "Integrated Circuit", Manufacturer_Name=STMicroelectronics, Datasheet Link=https://www.st.com/resource/en/datasheet/stm32c551cc.pdf, Height=1.6mm, Manufacturer_Part_Number=STM32C552RET6
VR1 VR2 VR3 VR4 VR5 VR6 VR7: library part 3362S-1-202LF, "3362S Series, 1/4 ” Square  Potentiometer, 2k, 10%, 0.5 Watts, 1Turn", Supplier Part Number 1=2321842, Supplier 1=Farnell
X1: library part CX2520SB24000D0FLJZZ, "Crystals, 24MHz", Supplier Part Number 1=1657889, Supplier 1=Farnell

## Free pads (board coordinates)
  round 1.524 hole 3: 3(6,97) 4(6,3) 5(148,3) 6(148,97)

## Via types
v1: diameter 0.61, hole 0.305, Top Layer to Bottom Layer, 2 vias

## Nets (pads, with @x,y where several pads share a name; then routed paths per layer and width w, separated by ;. In a path a pad name is that pad's centre, name@x,y a point inside that pad or via, vN(x,y) a via of type N, cw(c..) or ccw(c..) an arc to the next point about the centre after c; other vN are vias at no path point)
+3V3: C1.2 C2.2 C3.2 C4.2 C5.2 C6.2 C7.2 C9.2 C10.2 C12.2 C13.2 C14.2 C15.2 C36.2 C38.2 C50.1 C52.1 C64.1 C66.1 IC1.3 IC1.5 IC3.25 IC3.42 IC4.25 IC4.42 IC5.25 IC5.42 IC6.25 IC6.42 IC7.25 IC7.42 IC8.25 IC8.42 J1.1 L1.2 P4.1 P6.1 P8.1 P11.1 P13.1 P15.1 R5.2 R9.2 R12.1 R13.1 R14.1 R15.1 R16.1 R17.1 R18.1 R19.1 R20.1 R21.1 R22.1 R23.1 R24.1 R25.1 R26.1 R27.1 R28.1 R29.1 T1.1 U1.13 U1.19 U1.32 U1.48 U1.64 VR2.1 VR3.1 VR4.1 VR5.1 VR6.1 VR7.1 | length 124.3
  Top Layer w0.2: 35.483,42.622 U1.64@35.862,42.622
  Top Layer w0.3: C5.2 33.909,44.196 35.483,42.622 ; C7.2 33.02,36.322 33.252,36.554 U1.13 ; U1.19 36.662,31.791 C1.2 ; U1.32 41.862,34.163 C3.2 ; U1.48 43.087,43.664 44.127,44.704 C2.2 ; IC4.42 76.279,67.818 76.455,67.994 76.455,78.614 ; IC4.25 76.455,78.614 ; IC5.42 76.39,43.497 76.645,43.752 76.645,54.293 ; IC5.25 76.645,54.293 ; IC7.42 76.517,18.224 76.772,18.479 76.772,29.02 ; IC7.25 76.772,29.02 ; C64.1 77.47,29.718 76.772,29.02 ; C38.2 77.518,79.677 76.455,78.614 ; C50.1 77.597,55.245 76.645,54.293 ; IC3.42 104.462,67.757 105.429,67.757 105.537,67.866 105.537,78.486 ; IC3.25 105.537,78.486 ; IC6.42 104.843,43.289 105.869,43.289 106.045,43.465 106.045,53.594 106.49,54.039 ; IC6.25 106.49,54.039 ; IC8.42 104.942,18.079 106.029,18.079 106.205,18.255 106.205,28.989 ; IC8.25 106.109,28.893 107.315,30.099 C66.1 ; C36.2 106.42,79.369 105.537,78.486 ; C52.1 107.442,54.991 106.49,54.039
+48V: C16.2 C17.2 C18.2 C19.2 F1.2 F2.2 F3.2 F4.2 F5.2 F6.2 F7.1 F8.1 F9.1 F10.1 F11.1 F12.1 IC2.2 IC2.3 P1.1
ADC_DRV1: P15.2 U1.14
ADC_DRV2: P13.2 U1.15
ADC_DRV3: P11.2 U1.16
ADC_DRV4: P8.2 U1.17
ADC_DRV5: P6.2 U1.20
ADC_DRV6: P4.2 U1.21
AOUT1_DRV1: IC4.4 IC4.5 IC4.6 P3.6
AOUT1_DRV2: IC3.4 IC3.5 IC3.6 P5.6
AOUT1_DRV3: IC6.4 IC6.5 IC6.6 P7.6
AOUT1_DRV4: IC5.4 IC5.5 IC5.6 P10.6
AOUT1_DRV5: IC8.4 IC8.5 IC8.6 P12.6
AOUT1_DRV6: IC7.4 IC7.5 IC7.6 P14.6
AOUT2_DRV1: IC4.7 IC4.8 IC4.9 P3.4
AOUT2_DRV2: IC3.7 IC3.8 IC3.9 P5.4
AOUT2_DRV3: IC6.7 IC6.8 IC6.9 P7.4
AOUT2_DRV4: IC5.7 IC5.8 IC5.9 P10.4
AOUT2_DRV5: IC8.7 IC8.8 IC8.9 P12.4
AOUT2_DRV6: IC7.7 IC7.8 IC7.9 P14.4
BOUT1_DRV1: IC4.14 IC4.15 IC4.16 P3.3
BOUT1_DRV2: IC3.14 IC3.15 IC3.16 P5.3
BOUT1_DRV3: IC6.14 IC6.15 IC6.16 P7.3
BOUT1_DRV4: IC5.14 IC5.15 IC5.16 P10.3
BOUT1_DRV5: IC8.14 IC8.15 IC8.16 P12.3
BOUT1_DRV6: IC7.14 IC7.15 IC7.16 P14.3
BOUT2_DRV1: IC4.17 IC4.18 IC4.19 P3.1
BOUT2_DRV2: IC3.17 IC3.18 IC3.19 P5.1
BOUT2_DRV3: IC6.17 IC6.18 IC6.19 P7.1
BOUT2_DRV4: IC5.17 IC5.18 IC5.19 P10.1
BOUT2_DRV5: IC8.17 IC8.18 IC8.19 P12.1
BOUT2_DRV6: IC7.17 IC7.18 IC7.19 P14.1
DEBUG_SWCLK: J1.2 U1.49
DEBUG_SWDIO: J1.4 U1.46
DEBUG_SWO: J1.6 U1.55
DIR_DRV1: IC4.40 U1.37
DIR_DRV2: IC3.40 U1.36
DIR_DRV3: IC6.40 U1.29
DIR_DRV4: IC5.40 U1.28
DIR_DRV5: IC8.40 U1.27
DIR_DRV6: IC7.40 U1.26
ENABLE_DRV_ALL: IC3.41 IC4.41 IC5.41 IC6.41 IC7.41 IC8.41 R1.2 U1.62 | length 11
  Top Layer w0.2: R1.2 30.607,50.927 30.607,50.038 36.662,43.983 U1.62
FDCAN1_RX: IC1.4 U1.33
FDCAN1_TX: IC1.1 U1.34
GND: C1.1 C2.1 C3.1 C4.1 C5.1 C6.1 C7.1 C8.2 C9.1 C10.1 C12.1 C13.1 C14.1 C15.1 C16.1 C17.1 C18.1 C19.1 C20.2 C21.2 C22.1 C23.2 C24.2 C27.1 C28.1 C29.1 C32.1 C33.1 C34.1 C35.1 C36.1 C37.1 C38.1 C41.1 C42.1 C43.1 C46.2 C47.1 C48.1 C49.1 C50.2 C51.2 C52.2 C55.1 C56.1 C57.1 C60.2 C61.1 C62.1 C63.1 C64.2 C65.2 C66.2 D1.3 D2.1 D2.2 D3.1 IC1.2 IC1.8 IC2.7 IC2.9 IC3.3 IC3.10 IC3.13 IC3.20 IC3.22 IC3.23 IC3.45 IC4.3 IC4.10 IC4.13 IC4.20 IC4.22 IC4.23 IC4.45 IC5.3 IC5.10 IC5.13 IC5.20 IC5.22 IC5.23 IC5.45 IC6.3 IC6.10 IC6.13 IC6.20 IC6.22 IC6.23 IC6.45 IC7.3 IC7.10 IC7.13 IC7.20 IC7.22 IC7.23 IC7.45 IC8.3 IC8.10 IC8.13 IC8.20 IC8.22 IC8.23 IC8.45 J1.5 J3.1 P2.1 P4.3 P4.4 P6.3 P6.4 P8.3 P8.4 P9.7 P11.3 P11.4 P13.3 P13.4 P15.3 P15.4 R1.1 R2.1 R3.2 R8.2 SW1.2 U1.12 U1.18 U1.31 U1.47 U1.63 VR1.2 VR2.2 VR3.2 VR4.2 VR5.2 VR6.2 VR7.2 X1.2 X1.4 | length 8
  Top Layer w0.2: C5.1 33.528,46.482 36.262,43.748 U1.63
NetC8_1: C8.1 U1.30 | length 2.4
  Top Layer w0.3: U1.30 41.062,33.106 41.171,32.997 41.171,32.489 C8.1
NetC11_1: C11.1 IC2.1 | length 4.1
  Top Layer w0.3: IC2.1 41.062,65.344 42.558,66.841 C11.1
NetC11_2: C11.2 D2.3 IC2.8 L1.1 | length 0.1
  Top Layer w0.3: C11.2@45.358,66.841 C11.2
NetC20_1: C20.1 R6.2 | length 2.8
  Top Layer w0.3: R6.2 C20.1
NetC21_1: C21.1 IC2.6 R6.1 | length 11.1
  Top Layer w0.3: IC2.6 49.603,60.887 R6.1 49.53,60.96 C21.1
NetC23_1: C23.1 R11.2 X1.3 | length 6.6
  Top Layer w0.3: X1.3 29.116,27.97 30.099,26.987 R11.2 C23.1
NetC24_1: C24.1 R10.1 X1.1 | length 6.5
  Top Layer w0.3: C24.1 R10.1 25.527,26.797 X1.1
NetC25_1: C25.1 C27.2 C28.2 C29.2 F1.1 IC3.2 IC3.11 IC3.12 IC3.21 | length 4.9
  Top Layer w0.3: C25.1 109.728,66.802 109.982,67.056 IC3.2 IC3.2@112.057,66.969
NetC25_2: C25.2 IC3.1 | length 2
  Top Layer w0.2: IC3.1 112.014,66.376 C25.2
NetC26_1: C26.1 IC3.44 | length 2.2
  Top Layer w0.2: C26.1 IC3.44
NetC26_2: C26.2 IC3.43 | length 4.6
  Top Layer w0.2: C26.2 102.294,64.962 102.294,66.041 103.309,67.056 IC3.43
NetC30_1: C30.1 C33.2 C34.2 C35.2 F2.1 IC4.2 IC4.11 IC4.12 IC4.21
NetC30_2: C30.2 IC4.1
NetC31_1: C31.1 IC4.44 | length 2.1
  Top Layer w0.2: C31.1 75.184,66.504 IC4.44
NetC31_2: C31.2 IC4.43 | length 5.1
  Top Layer w0.2: C31.2 72.384,66.415 73.153,67.184 IC4.43
NetC32_2: C32.2 IC3.24 | length 2.8
  Top Layer w0.3: C32.2 101.854,79.605 102.339,79.12 IC3.24
NetC37_2: C37.2 IC4.24 | length 2.8
  Top Layer w0.2: C37.2 73.683,79.721 74.157,79.248 IC4.24
NetC39_1: C39.1 IC5.1
NetC39_2: C39.2 C41.2 C42.2 C43.2 F3.1 IC5.2 IC5.11 IC5.12 IC5.21
NetC40_1: C40.1 IC5.43 | length 4.4
  Top Layer w0.2: C40.1 73.344,40.578 73.344,41.405 74.684,42.746 75.215,42.746 IC5.43
NetC40_2: C40.2 IC5.44 | length 2.4
  Top Layer w0.2: IC5.44 75.444,42.116 C40.2
NetC44_1: C44.1 IC6.1
NetC44_2: C44.2 C47.2 C48.2 C49.2 F4.1 IC6.2 IC6.11 IC6.12 IC6.21
NetC45_1: C45.1 IC6.43 | length 5.3
  Top Layer w0.2: IC6.43 106.362,42.609 106.553,42.418 106.553,41.375 104.902,39.724 C45.1
NetC45_2: C45.2 IC6.44 | length 4.6
  Top Layer w0.2: C45.2 102.102,41.142 102.933,41.973 IC6.44
NetC46_1: C46.1 IC5.24 | length 3.1
  Top Layer w0.2: C46.1 73.646,55.499 74.218,54.927 IC5.24
NetC51_1: C51.1 IC6.24 | length 2.9
  Top Layer w0.2: C51.1 103.237,55.118 103.682,54.673 IC6.24
NetC53_1: C53.1 IC7.1
NetC53_2: C53.2 C55.2 C56.2 C57.2 F5.1 IC7.2 IC7.11 IC7.12 IC7.21
NetC54_1: C54.1 IC7.43 | length 5.5
  Top Layer w0.2: C54.1 72.644,16.891 73.343,17.59 IC7.43
NetC54_2: C54.2 IC7.44 | length 2.5
  Top Layer w0.2: C54.2 75.444,16.938 IC7.44
NetC58_1: C58.1 IC8.1
NetC58_2: C58.2 C61.2 C62.2 C63.2 F6.1 IC8.2 IC8.11 IC8.12 IC8.21
NetC59_1: C59.1 IC8.43 | length 5.3
  Top Layer w0.2: C59.1 102.235,16.764 102.934,17.463 IC8.43
NetC59_2: C59.2 IC8.44 | length 2.4
  Top Layer w0.2: IC8.44 105.035,16.716 C59.2
NetC60_1: C60.1 IC7.24 | length 2.6
  Top Layer w0.2: C60.1 74.027,30.099 74.423,29.704 75.41,29.704 IC7.24
NetC65_1: C65.1 IC8.24 | length 2.9
  Top Layer w0.2: C65.1 103.364,29.972 103.809,29.527 IC8.24
NetD1_1: D1.1 IC1.6 J3.3 R4.1 | length 31
  Top Layer w0.3: J3.3 48.928,24.798 50.8,26.67 R4.1 ; IC1.6 61.226,33.274 D1.1@61.326,33.374 ; R4.1@60.044,26.67 61.326,27.952 D1.1@61.326,33.374 ; D1.1 D1.1@61.326,33.374
NetD1_2: D1.2 IC1.7 J2.1 J3.2 | length 7.8
  Top Layer w0.3: J2.1 53.928,23.796 J3.2
NetF7_2: F7.2 P9.1 | length 5.2
  Top Layer w0.5: F7.2 126.399,13.623 126.873,14.097 127.508,14.097 127.801,14.39 127.801,15.855 P9.1
NetF8_2: F8.2 P9.2 | length 4.2
  Top Layer w0.5: F8.2 130.363,14.158 130.59,14.385 P9.2
NetF9_2: F9.2 P9.3 | length 4.6
  Top Layer w0.5: P9.3 133.423,15.811 133.423,14.405 134.3,13.528 F9.2
NetF10_2: F10.2 P9.4 | length 5.9
  Top Layer w0.5: P9.4 135.903,15.87 135.903,14.338 136.271,13.97 137.541,13.97 138.198,13.313 F10.2
NetF11_2: F11.2 P9.5 | length 6.4
  Top Layer w0.5: P9.5 140.598,13.716 141.732,13.716 142.147,13.301 F11.2
NetF12_2: F12.2 P9.6 | length 7.9
  Top Layer w0.5: P9.6 142.757,14.097 145.161,14.097 146.084,13.174 F12.2
NetIC2_4: IC2.4 R8.1 | length 3.3
  Top Layer w0.3: IC2.4 41.062,57.744 41.489,57.317 41.489,57.254 41.974,56.769 R8.1
NetIC2_5: IC2.5 R5.1 R7.2 | length 3.5
  Top Layer w0.3: IC2.5 46.79,59.617 46.99,59.417 R5.1
NetIC3_28: IC3.28 R14.2 | length 4.6
  Top Layer w0.2: R14.2 101.346,74.231 101.881,74.767 102.453,74.767 102.997,75.311 102.997,76.2 103.377,76.58 IC3.28
NetIC4_28: IC4.28 R17.2 | length 4.7
  Top Layer w0.2: R17.2 71.846,74.937 72.397,74.937 74.168,76.708 IC4.28
NetIC5_28: IC5.28 R20.2 | length 4.9
  Top Layer w0.2: R20.2 71.43,50.221 72.192,50.221 74.358,52.387 IC5.28
NetIC6_28: IC6.28 R23.2 | length 4.7
  Top Layer w0.2: R23.2 101.611,50.176 101.91,50.176 103.867,52.133 IC6.28
NetIC7_28: IC7.28 R26.2 | length 4.4
  Top Layer w0.2: R26.2 72.319,25.456 72.7,25.456 74.24,26.996 75.342,26.996 IC7.28
NetIC8_28: IC8.28 R29.2 | length 4.6
  Top Layer w0.2: R29.2 101.346,24.701 103.631,26.987 IC8.28
NetJ2_2: J2.2 R4.2 | length 3.7
  Top Layer w0.3: J2.2 59.811,24.003 R4.2
NetLED1_A: LED1.A U1.39
NetLED1_K: LED1.K R3.1
NetR2_2: R2.2 U1.60 | length 9.8
  Top Layer w0.2: R2.2 34.544,50.8 34.544,47.625 37.462,44.707 U1.60
NetR7_1: R7.1 VR1.1 VR1.W | length 3.7
  Top Layer w0.3: R7.1 50.165,55.372 VR1.1
NFAULT_DRV1: IC4.26 R15.2 U1.1 | length 5.8
  Top Layer w0.2: R15.2 70.231,79.692 70.766,79.158 70.83,79.158 72.009,77.978 IC4.26
NFAULT_DRV2: IC3.26 R12.2 U1.2 | length 5.5
  Top Layer w0.3: R12.2 99.695,79.566 100.18,79.081 100.243,79.081 101.474,77.85 IC3.26
NFAULT_DRV3: IC6.26 R21.2 U1.3 | length 5.6
  Top Layer w0.2: R21.2 99.949,55.054 100.484,54.52 100.548,54.52 101.664,53.403 IC6.26
NFAULT_DRV4: IC5.26 R18.2 U1.4 | length 5.9
  Top Layer w0.2: R18.2 70.231,55.435 70.766,54.901 70.83,54.901 72.073,53.657 IC5.26
NFAULT_DRV5: IC8.26 R27.2 U1.8 | length 6.1
  Top Layer w0.2: R27.2 100.068,29.853 100.068,29.091 100.902,28.257 IC8.26
NFAULT_DRV6: IC7.26 R24.2 U1.9 | length 5.5
  Top Layer w0.2: R24.2 70.739,30.035 71.274,29.501 71.338,29.501 72.454,28.384 IC7.26
NHOME_DRV1: IC4.27 R16.2 U1.22 | length 7
  Top Layer w0.2: R16.2 69.469,74.612 70.004,75.148 70.068,75.148 70.612,75.692 72.263,75.692 73.915,77.344 IC4.27
NHOME_DRV2: IC3.27 R13.2 U1.23 | length 6.8
  Top Layer w0.2: R13.2 99.441,74.231 99.976,74.767 100.04,74.767 100.584,75.311 102.235,75.311 102.489,75.565 102.489,76.581 103.124,77.216 IC3.27
NHOME_DRV3: IC6.27 R22.2 U1.24 | length 7.5
  Top Layer w0.2: R22.2 99.949,49.657 100.172,49.88 100.172,50.642 100.33,50.8 101.495,50.8 103.464,52.769 IC6.27
NHOME_DRV4: IC5.27 R19.2 U1.25 | length 7.3
  Top Layer w0.2: R19.2 69.957,50.653 69.957,51.034 70.125,51.202 70.332,51.202 70.437,51.308 72.263,51.308 73.978,53.023 IC5.27
NHOME_DRV5: IC8.27 R28.2 U1.10 | length 6.8
  Top Layer w0.2: R28.2 99.441,24.701 99.976,25.237 100.04,25.237 100.711,25.908 101.876,25.908 103.591,27.623 IC8.27
NHOME_DRV6: IC7.27 R25.2 U1.11 | length 6.7
  Top Layer w0.2: R25.2 69.977,25.082 70.512,25.618 70.576,25.618 71.12,26.162 72.285,26.162 73.873,27.75 IC7.27
OSC_IN: R10.2 U1.5 | length 20.5
  Top Layer w0.2: R10.2 22.733,36.195 26.292,39.754 U1.5
OSC_OUT: R11.1 U1.6 | length 25.4
  Top Layer w0.2: R11.1 25.019,29.21 23.241,30.988 23.241,36.052 26.543,39.354 U1.6
RESET: C22.2 D3.2 J1.3 R9.1 SW1.1 U1.7 | length 7.8
  Top Layer w0.3: R9.1 32.853,12.867 SW1.1 ; C22.2 37.895,19.939 38.022,20.066 D3.2
SPI2_MISO: IC3.36 IC4.36 IC5.36 IC6.36 IC7.36 IC8.36 U1.38 | length 140
  Top Layer w0.2: IC4.36 71.501,71.628 67.31,67.437 67.31,47.752 ; IC5.36 67.755,47.307 67.31,47.752 ; IC7.36 67.882,22.034 67.31,22.606 67.31,47.752 ; IC3.36 99.186,71.5 97.663,69.977 97.663,48.051 ; IC6.36 98.661,47.053 97.663,48.051 ; IC8.36 99.886,21.907 97.663,24.13 97.663,48.051
SPI2_MOSI: IC3.37 IC4.37 IC5.37 IC6.37 IC7.37 IC8.37 U1.41 | length 57.4
  Top Layer w0.2: 67.945,48.768 67.945,67.183 71.756,70.994 IC4.37 ; 67.964,23.622 67.964,46.12 68.517,46.673 IC5.37
SPI2_NSS_DRV1: IC4.34 U1.58 | length 54.9
  Top Layer w0.2: U1.58 38.262,50.073 39.594,51.405 51.182,51.405 62.818,63.042 62.818,64.723 70.993,72.898 IC4.34
SPI2_NSS_DRV2: IC3.34 U1.57
SPI2_NSS_DRV3: IC6.34 U1.54
SPI2_NSS_DRV4: IC5.34 U1.52
SPI2_NSS_DRV5: IC8.34 U1.51
SPI2_NSS_DRV6: IC7.34 U1.40
SPI2_SCK: IC3.38 IC4.38 IC5.38 IC6.38 IC7.38 IC8.38 U1.42 | length 55.3
  Top Layer w0.2: 68.345,48.768 68.345,66.567 72.136,70.358 IC4.38 ; 68.453,23.622 68.453,45.593 68.897,46.037 IC5.38
TIM2_CH1_STEP: IC4.39 U1.50
TIM5_CH1_STEP: IC3.39 U1.56
TIM12_CH1_STEP: IC6.39 U1.35
TIM15_CH1_STEP: IC5.39 U1.53
TIM16_CH1_STEP: IC8.39 U1.59 | length 5.8
  Top Layer w0.2: v1(35.941,47.625) 37.862,45.704 U1.59
TIM17_CH1_STEP: IC7.39 U1.61 | length 8.3
  Top Layer w0.2: v1(32.639,49.022) 32.676,48.985 32.676,48.604 37.062,44.218 U1.61
Vref_DRV1: IC4.33 VR3.W
Vref_DRV2: IC3.33 VR2.W
Vref_DRV3: IC6.33 VR5.W
Vref_DRV4: IC5.33 VR4.W
Vref_DRV5: IC8.33 VR7.W
Vref_DRV6: IC7.33 VR6.W
pads on no net: IC3.29 IC3.30 IC3.31 IC3.32 IC3.35 IC4.29 IC4.30 IC4.31 IC4.32 IC4.35 IC5.29 IC5.30 IC5.31 IC5.32 IC5.35 IC6.29 IC6.30 IC6.31 IC6.32 IC6.35 IC7.29 IC7.30 IC7.31 IC7.32 IC7.35 IC8.29 IC8.30 IC8.31 IC8.32 IC8.35 P3.0 P3.2 P3.5 P5.0 P5.2 P5.5 P7.0 P7.2 P7.5 P10.0 P10.2 P10.5 P12.0 P12.2 P12.5 P14.0 P14.2 P14.5 SW1.0 U1.43 U1.44 U1.45

## Polygon pours and split planes (outlines as drawn)
no net on Int1 (GND) (split plane): 150.241,99.693 150.316,99.693 150.463,99.663 150.601,99.606 150.725,99.523 150.831,99.417 150.914,99.293 150.971,99.155 151.001,99.008 151.001,98.933 151.001,1.778 151.001,1.703 150.971,1.556 150.914,1.418 150.831,1.294 150.725,1.188 150.601,1.105 150.463,1.048 150.316,1.018 150.241,1.018 1.905,1.018 1.83,1.018 1.683,1.048 1.545,1.105 1.421,1.188 1.315,1.294 1.232,1.418 1.175,1.556 1.145,1.703 1.145,1.778 1.145,98.933 1.145,99.008 1.175,99.155 1.232,99.293 1.315,99.417 1.421,99.523 1.545,99.606 1.683,99.663 1.83,99.693 1.905,99.693
no net on Int4 (PWR) (split plane): 150.241,99.693 150.316,99.693 150.463,99.663 150.601,99.606 150.725,99.523 150.831,99.417 150.914,99.293 150.971,99.155 151.001,99.008 151.001,98.933 151.001,1.778 151.001,1.703 150.971,1.556 150.914,1.418 150.831,1.294 150.725,1.188 150.601,1.105 150.463,1.048 150.316,1.018 150.241,1.018 1.905,1.018 1.83,1.018 1.683,1.048 1.545,1.105 1.421,1.188 1.315,1.294 1.232,1.418 1.175,1.556 1.145,1.703 1.145,1.778 1.145,98.933 1.145,99.008 1.175,99.155 1.232,99.293 1.315,99.417 1.421,99.523 1.545,99.606 1.683,99.663 1.83,99.693 1.905,99.693

## Silkscreen, mask and mechanical layers (free items; w line width, h text height)
Mechanical 1:
  the board outline again, w0.381

## Text inside footprints (layer, text, board x,y; h text height)
J1: Top Overlay "1" at 58.779,93.487 h1.27; Top Overlay "2" at 58.271,96.027 h1.27; Top Overlay "5" at 67.415,93.487 h1.27; Top Overlay "6" at 67.415,96.027 h1.27